# Altium PCB PCB1.PcbDoc
Units mm, origin at the board's own origin, x right, y up, seen from the top; angles counter-clockwise.
Board outline 40 x 25 mm, 4 copper layers (Top Layer, Ground Layer, Power Layer, Bottom Layer), stack 1.603 mm thick; 44 components, 25 nets, 168 pads, 65 vias.
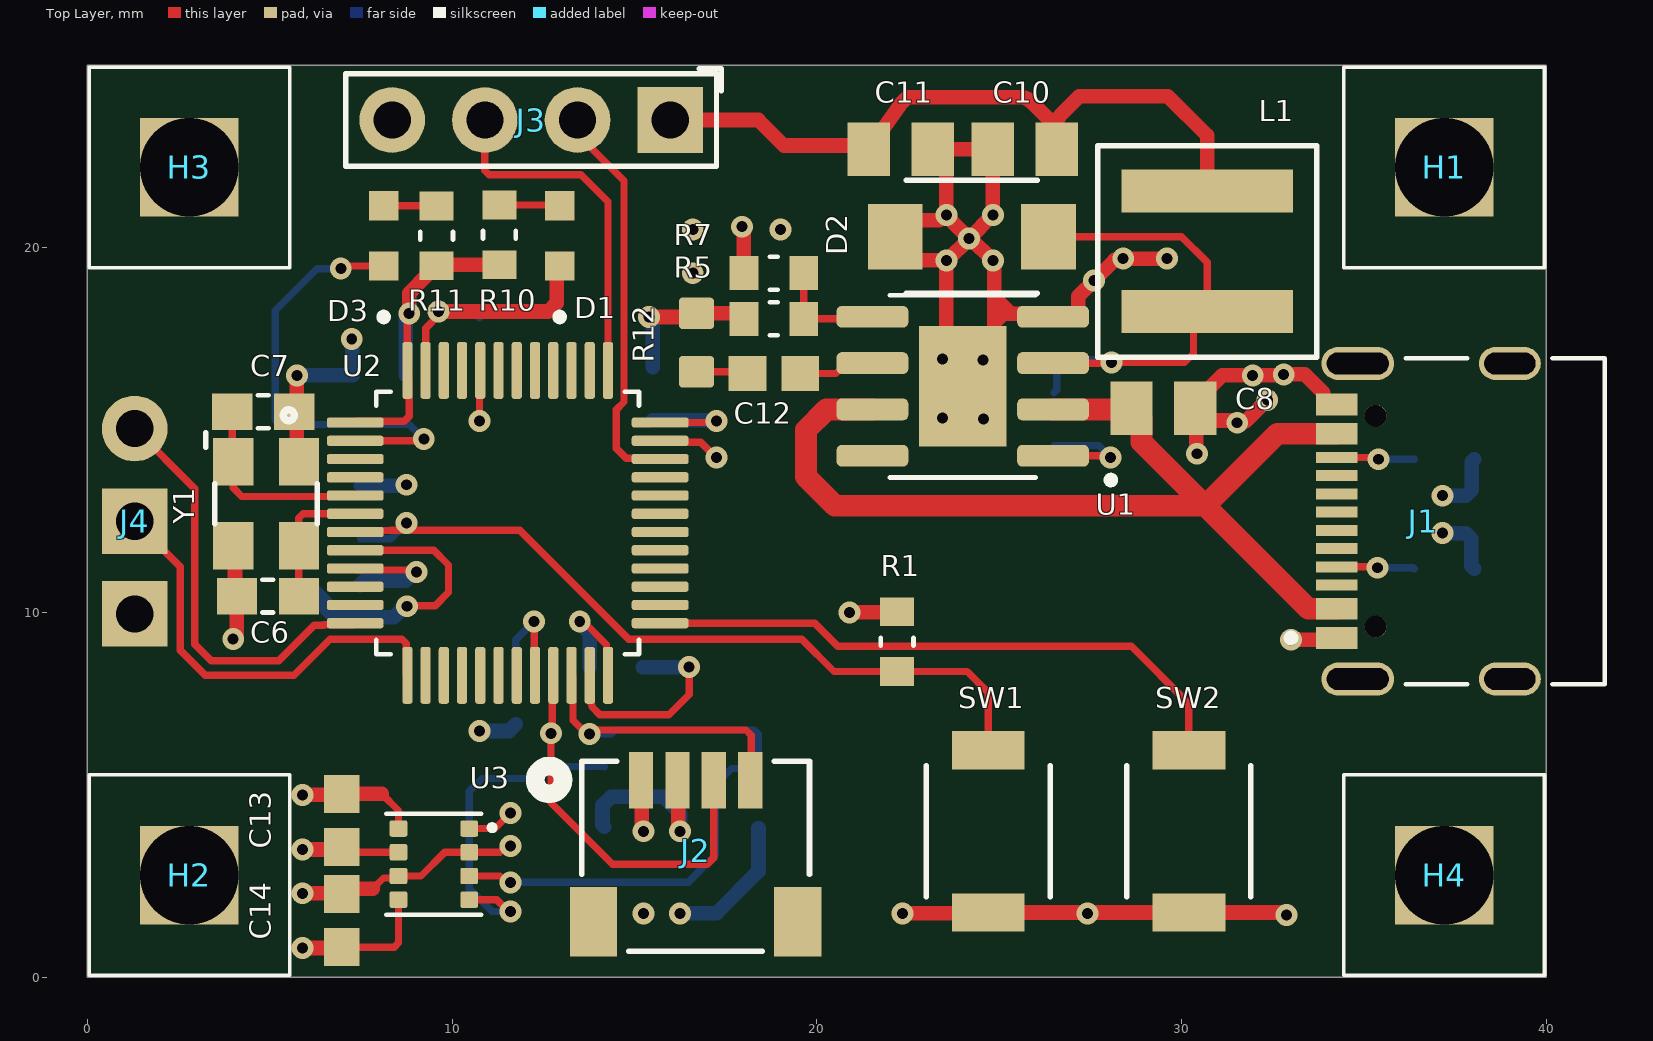
[diagram p0: Top Layer view]
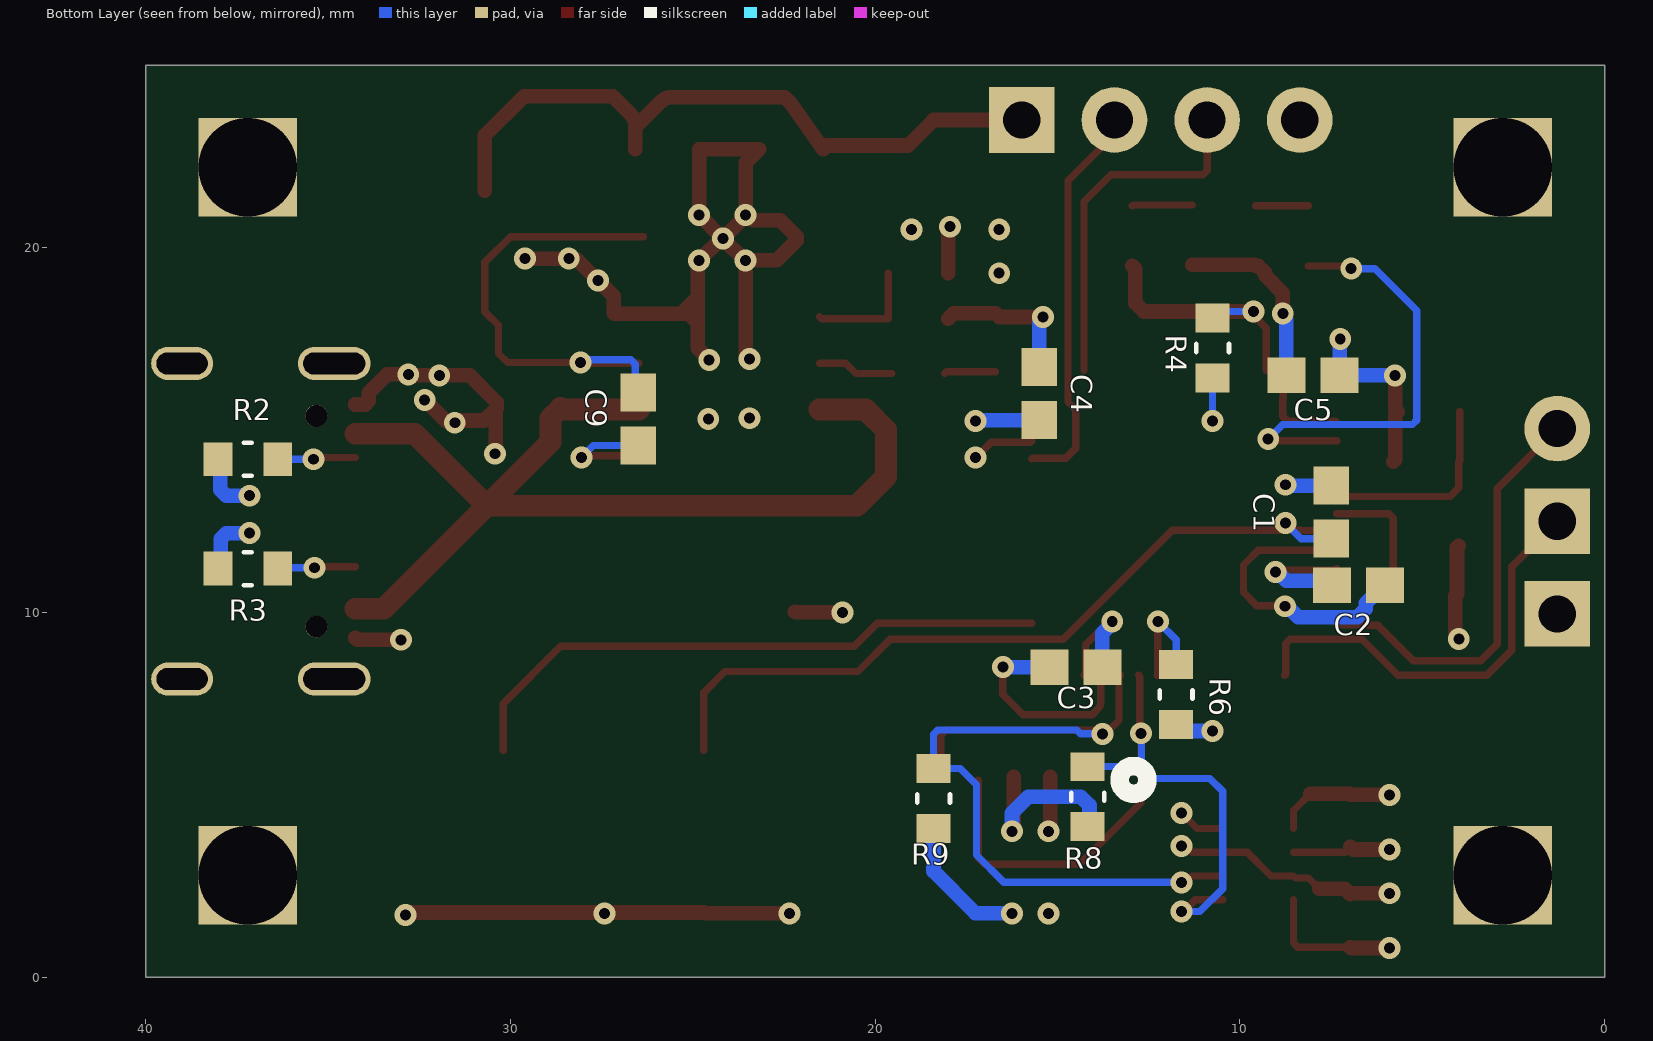
[diagram p1: Bottom Layer view, seen from below]
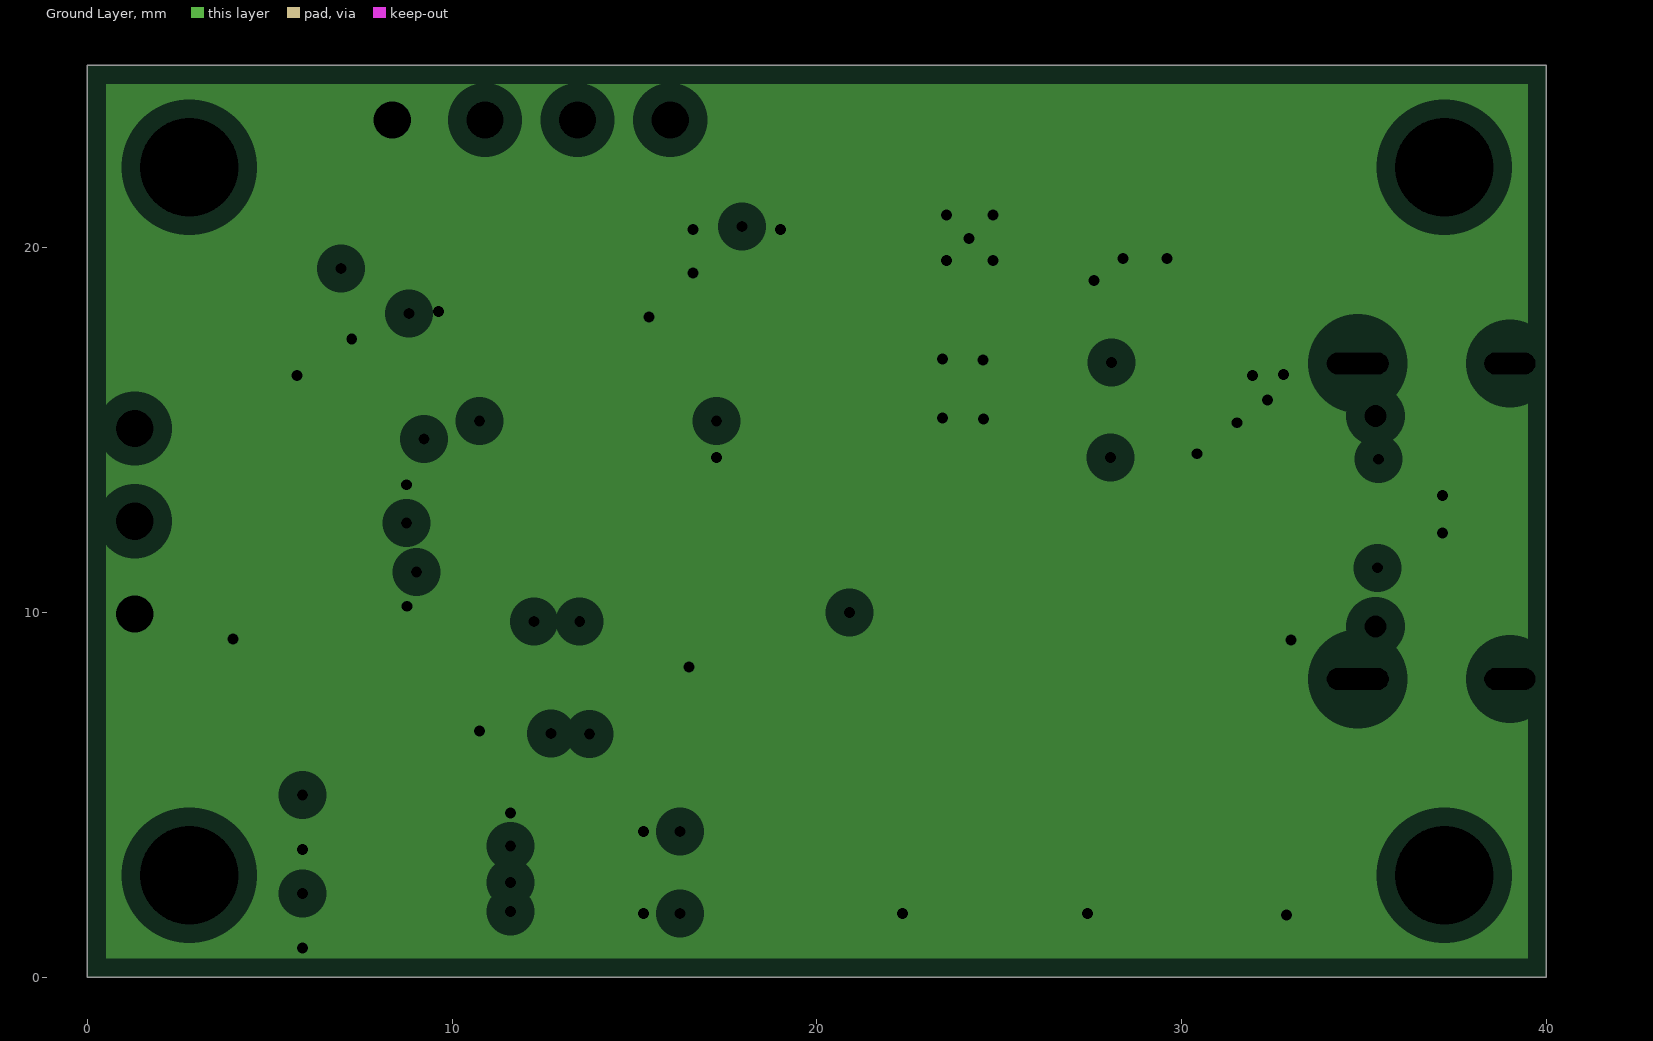
[diagram p2: Ground Layer, clearances drawn from the general rule]
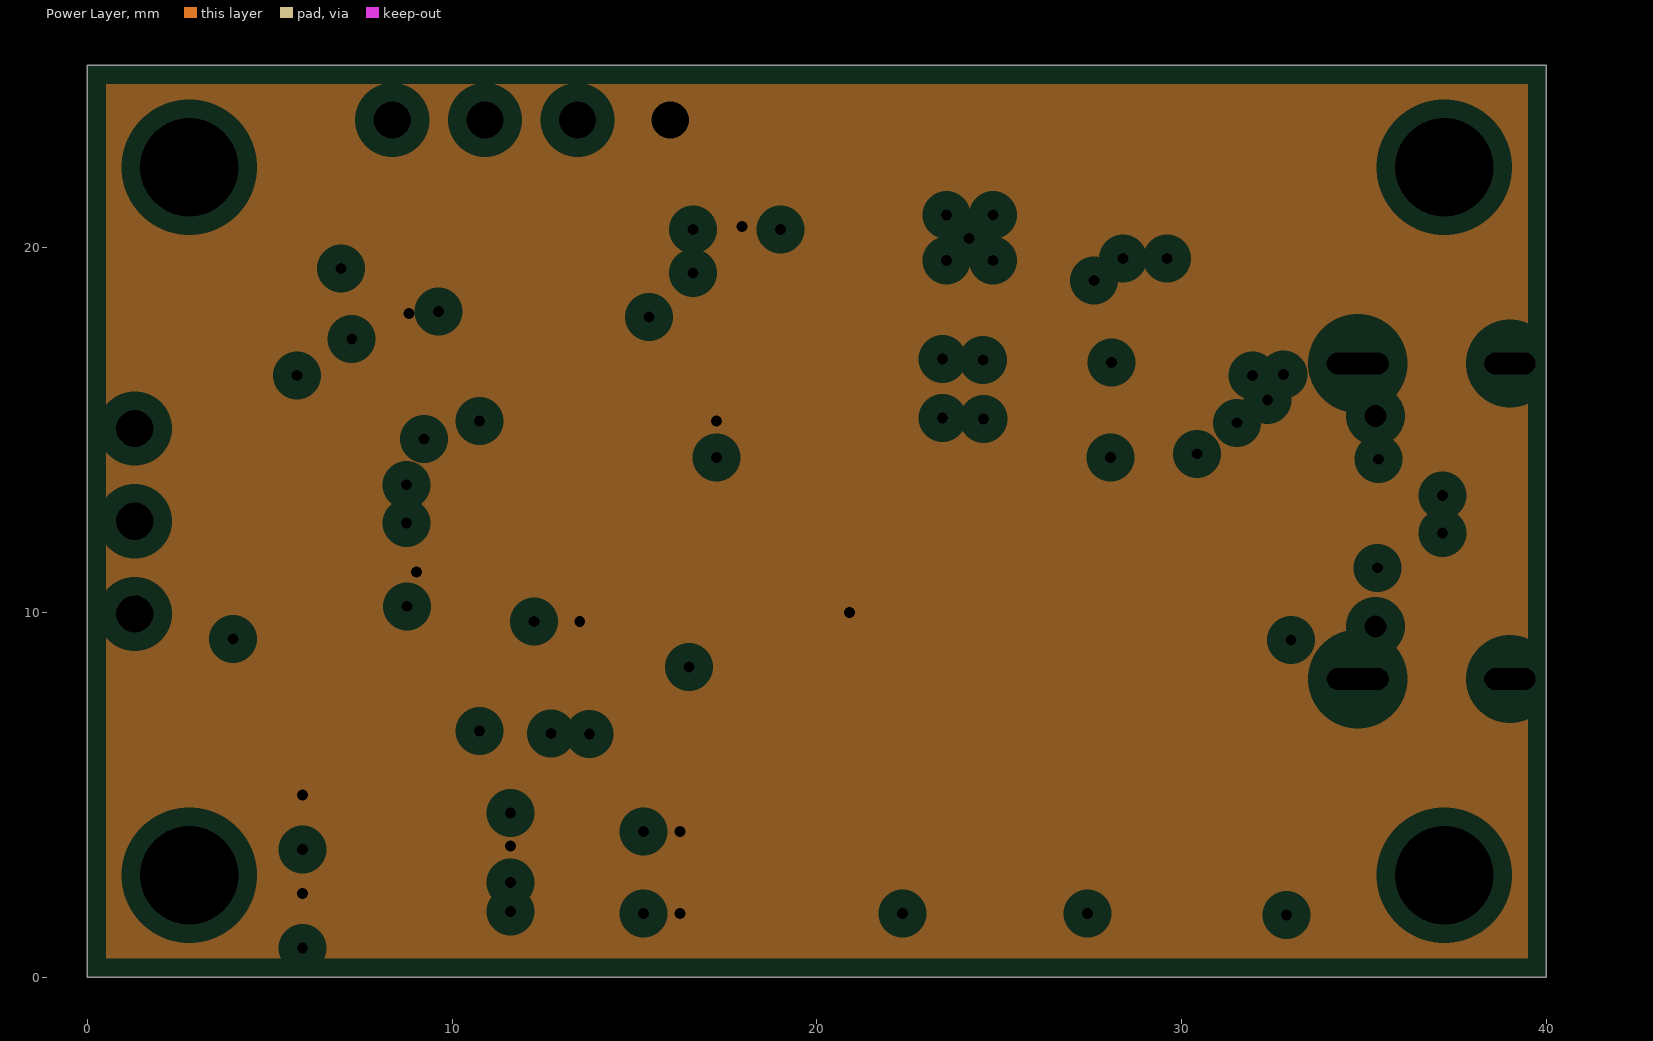
[diagram p3: Power Layer, clearances drawn from the general rule]
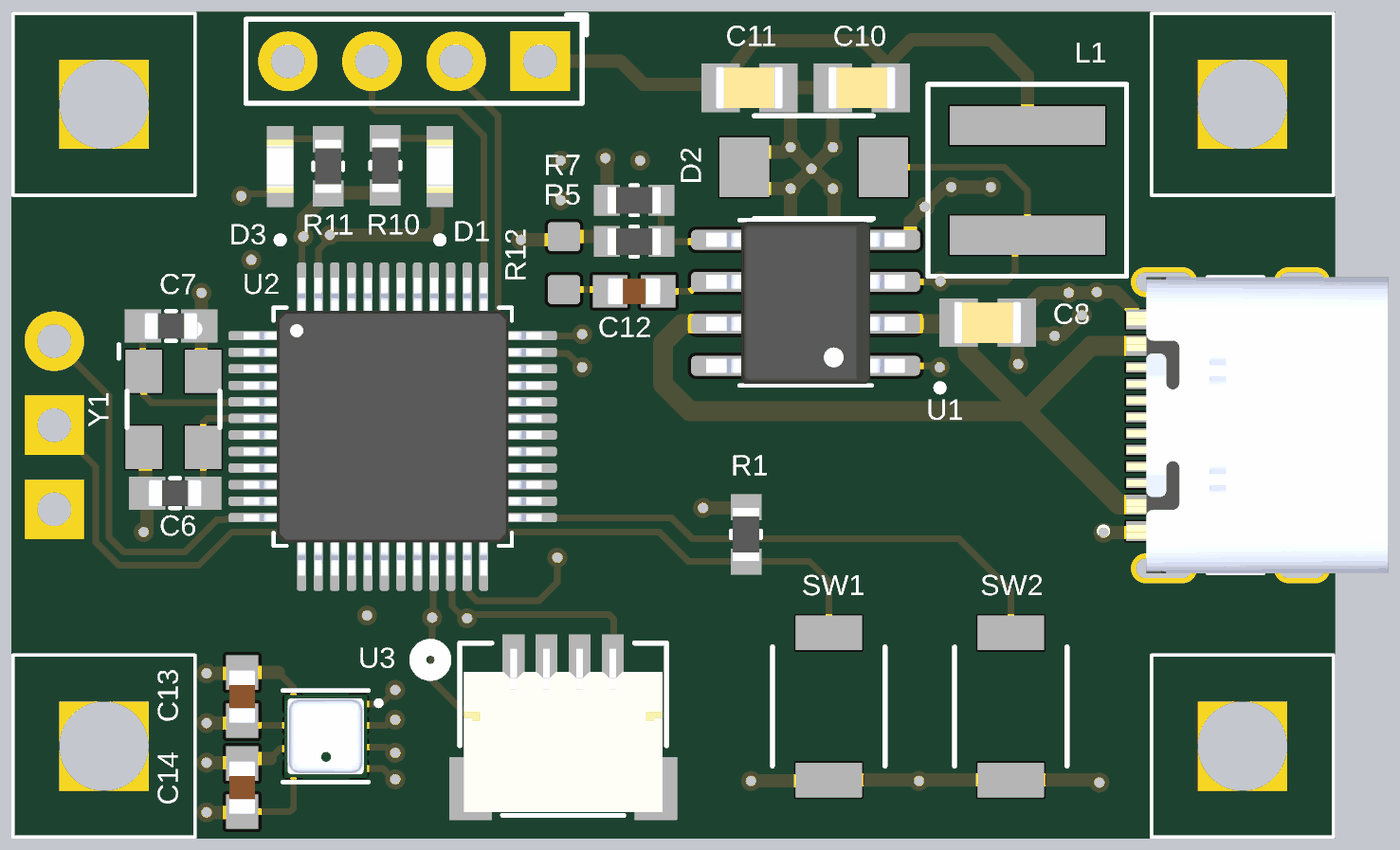
[diagram p4: 3D render of the assembled board from above, using the file's embedded part models]
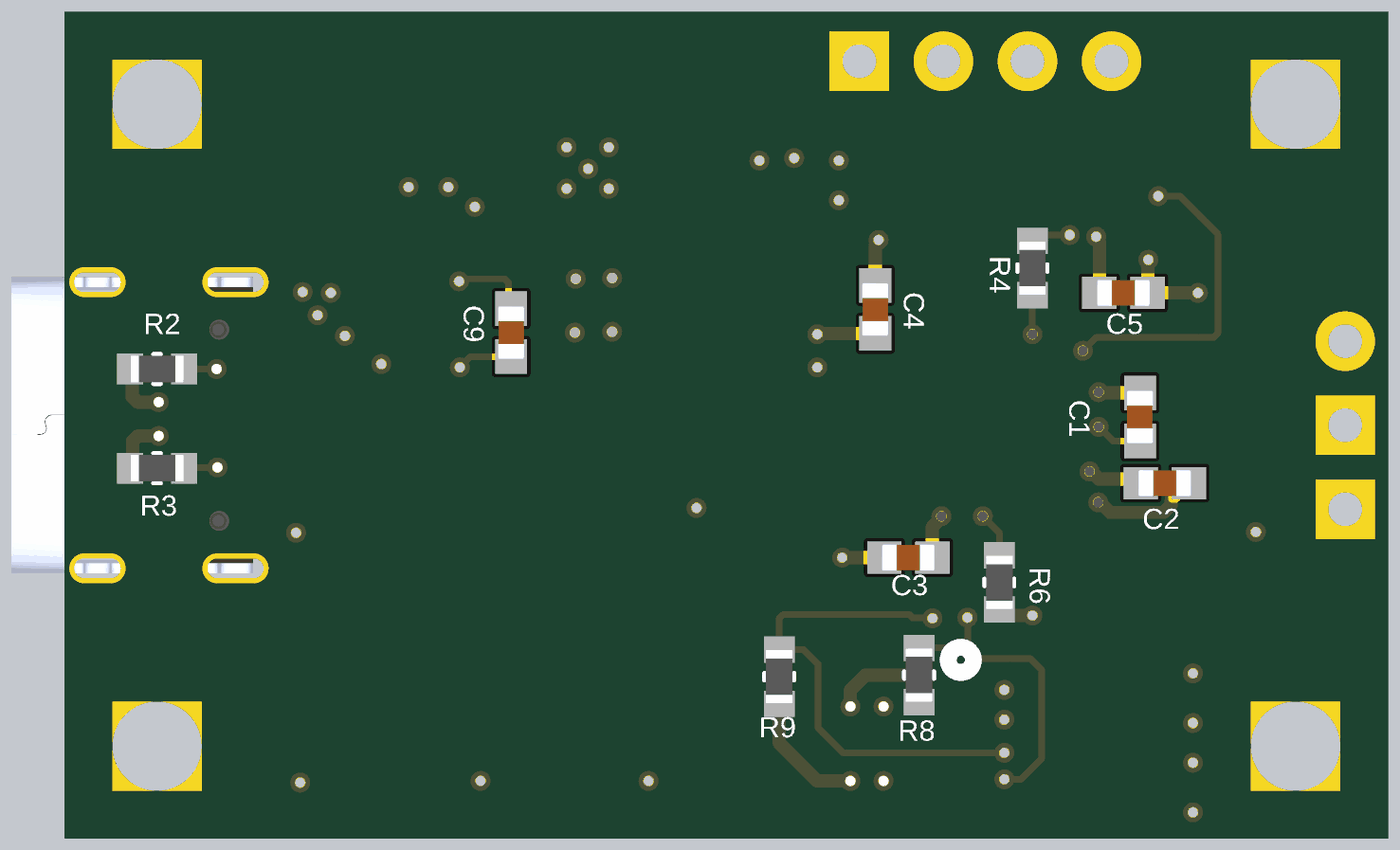
[diagram p5: 3D render of the assembled board from below, using the file's embedded part models]

## Layer stack, top to bottom
Top Solder: solder mask 0.0102, Solder Resist, Dk 3.5
Top Layer: signal copper 0.0356
Dielectric 2: prepreg 0.0711, PP-006, Dk 4.1
Ground Layer: plane copper 0.035, net GND
Dielectric 1: dielectric 1.32, FR-4, Dk 4.8
Power Layer: plane copper 0.035, net +3.3V
Dielectric 3: prepreg 0.0711, PP-006, Dk 4.1
Bottom Layer: signal copper 0.0356
Bottom Solder: solder mask 0.0102, Solder Resist, Dk 3.5

## Board outline
0,0 0,25 40,25 40,0

## Design rules (kind name [scope] priority, off if disabled: settings)
Clearance [All] p1: gap=0.2 ignorepadtopadclearanceinfootprint=FALSE
PlaneClearance [All] p1: clearance=0.508
PlaneConnect [All] p1: planeconnectstyle=Relief reliefexpansion=0.508 reliefentries=4 reliefconductorwidth=0.254 reliefairgap=0.254
PolygonConnect [iSVia] p1: connectstyle=Direct reliefconductorwidth=0.254 reliefentries=4 polygonreliefangle="90 Angle" airgapwidth=0.254
RoutingVias [All] p1: holewidth=0.4 width=0.8 viastyle="Through Hole" minholewidth=0.2 minwidth=0.4 maxholewidth=0.6 maxwidth=1.2
SolderMaskExpansion [All] p1: expansion=0 istentingtop=FALSE
SupplyNets "Schematic Supply Nets_2" [InNet('+5')] p1: voltage=0.000
SupplyNets "Schematic Supply Nets_1" [InNet('+3.3V')] p2: voltage=0.000
SupplyNets "Schematic Supply Nets" [InNet('GND')] p3: voltage=0.000
Width VIN_Power [InNetClass('VIN_Power')] p1: maxlimit=0.6 minlimit=0.6 preferedwidth=0.6
Width Power_GND [InNetClass('Power_Nets')] p2: maxlimit=0.4 minlimit=0.2 preferedwidth=0.4
Width Signal [All] p3: maxlimit=0.2 minlimit=0.2 preferedwidth=0.2
28 further rules are at their usual default settings.

## Classes and differential pairs
net class VIN_Power: +5
net class Power_Nets: +3.3V GND

## Components (designator, comment, footprint, x,y, rotation, side; value= is the part's Value field where it differs from the comment)
C1 "10nF" CAPC1608X95N 7.5,12.75 r270 bottom
C2 "100nF" CAPC1608X95N 6.75,10.75 r180 bottom
C3 "100nF" CAPC1608X95N 14.5,8.5 r0 bottom
C4 "100nF" CAPC1608X95N 15.5,16 r90 bottom
C5 "100nF" CAPC1608X95N 8,16.5 r180 bottom
C6 "22pF" CAPC1608X90 4.95,10.45 r180 top
C7 "22pF" CAPC1608X90 4.825,15.5 r180 top
C8 "10uF" CAPC2012X88N 29.5,15.6 r0 top
C9 "10nF" CAPC1608X95N 26.5,15.3 r270 bottom
C10 "22uF" CAPC2012X88N 25.7,22.7 r0 top
C11 "22uF" CAPC2012X88N 22.3,22.7 r180 top
C12 "3.9nF" CAPC1608X95N 18.82,16.55 r0 top
C13 "100nF" CAPC1608X95N 6.975,4.3 r270 top
C14 "100nF" CAPC1608X95N 6.975,1.55 r270 top
D1 "APT1608SGC" LED_APT1608SGC 12.95,20.325 r90 top
D2 "B340A-13-F" D_SMA_DO214AC 24.25,20.3 r180 top
D3 "D_LED_Red_0603" LED_APT1608SGC 8.125,20.325 r90 top value=APT1608SURCK
H1 "M2.5 NPTH" MH_M2_5_D2_7_NPTH 37.2,22.2 r0 top locked
H2 "M2.5 NPTH" MH_M2_5_D2_7_NPTH 2.8,2.8 r0 top locked
H3 "M2.5 NPTH" MH_M2_5_D2_7_NPTH 2.8,22.2 r0 top locked
H4 "M2.5 NPTH" MH_M2_5_D2_7_NPTH 37.2,2.8 r0 top locked
J1 "J_USB-C_TYPE-C-31-M-12" HRO_TYPE-C-31-M-12 39,12.5 r90 top locked value=TYPE-C-31-M-12
J2 "J_SM04B-SRSS-TB" CONN_SM04B-SRSS-TB_JST 16.675,3.3 r180 top value=SM04B-SRSS-TB
J3 "J_Header_1x04_2.54mm_THT" HDR_1x04_P2.54_THT 15.98,23.5 r180 top value=TSW-104-07-G-S
J4 "J_Header_1x03_2.54mm_THT" HDR_1x03_P2.54_THT 1.3,15.04 r270 top value=TSW-103-07-G-S
L1 "10uH" L_XGL5050 30.7,19.9 r90 top
R1 "10K" RESC1608X55N_10K 22.2,9.2 r270 top
R2 "5.1K" RESC1608X55N_10K 37.2,14.2 r0 bottom
R3 "5.1K" RESC1608X55N_10K 37.2,11.2 r0 bottom
R4 "10K" RESC1608X55N_10K 10.75,17.25 r90 bottom
R5 "33K" RESC1608X55N_10K 18.82,18.05 r180 top
R6 "10K" RESC1608X55N_10K 11.75,7.75 r270 bottom
R7 "82K" RESC1608X55N_10K 18.82,19.3 r0 top
R8 "4.7K" RESC1608X55N_10K 14.175,4.95 r90 bottom
R9 "4.7K" RESC1608X55N_10K 18.4,4.9 r90 bottom
R10 "1K" RESC1608X55N_10K 11.3,20.35 r90 top
R11 "1K" RESC1608X55N_10K 9.575,20.325 r270 top
R12 "6.8K" RESC1608X55N 16.7,17.4 r270 top
SW1 "HX 3x4x2-2P-2.5N" SW_HX_3x4x2_2P 24.7,4 r90 top
SW2 "SW_SPST_3x4x2mm" SW_HX_3x4x2_2P 30.2,4 r270 top value="HX 3x4x2-2P-2.5N"
U1 "U_MP2307DN-LF-Z" SOIC127P600X170-9N 24,16.2 r180 top value=340kHz
U2 "U_STM32F103C8T6" QFP50P900X900X160-48N 11.525,12.455 r0 top locked value=72MHz
U3 "U_BME280" PSON65P250X250X100-8N 9.5,3.1 r0 top value=BME280
Y1 "8MHz" XTAL_ECX32_3225_4P 4.9,12.98 r270 top

## Footprints (in the part's own frame and the unit in brackets; to place one, negate y for a bottom-side part, rotate by r counter-clockwise, add the part's x,y. Pads: shape width x height; smd on the part's side, far side on the other; paste and mask are expansions set on the pad)
CAPC1608X90 [mm]
  rect 1.1x1 smd: 1(-0.85,0) 2(0.85,0)
  silkscreen extent -0.15,-0.45 0.15,0.45, body extent -0.8,-0.4 0.8,0.4, height 0.9
CAPC1608X95N [mm]
  rect 1.04x0.97 smd paste+0 mask+0.102: 1(-0.726,0) 2(0.726,0)
  body extent -0.8,-0.4 0.8,0.4, height 0.95
CAPC2012X88N [mm]
  rect 1.16x1.47 smd: 1(-0.875,0) 2(0.875,0)
  body extent -1.02,-0.64 1.02,0.64, height 1.4
CONN_SM04B-SRSS-TB_JST [mil]
  rect 26x61 smd: 1(59.06,-82.62) 2(19.69,-82.62) 3(-19.68,-82.62) 4(-59.06,-82.62)
  rect 51x75 smd: 5(-110.24,69.94) 6(110.24,69.94)
  silkscreen extent -123,-103 173,102, body extent -118,-97 118,98, height 117
D_SMA_DO214AC [mm] "SMA DO-214AC generic; pad 1 cathode; verify manufacturer land pattern"
  rect 1.5x1.8 smd paste+0 mask+0.05: 1(-2.1,0) 2(2.1,0)
  silkscreen extent -1.8,-1.55 1.8,1.55, body extent -2.65,-1.3 2.65,1.3, height 2.3
HDR_1x03_P2.54_THT [mm] "1x3 P2.54mm; 1.02mm plated holes; 1.8mm pads"
  round 1.8 hole 1.02: 1(0,0)
  rect 1.8x1.8 hole 1.02: 2(2.54,0) 3(5.08,0)
  body extent -1.27,-1.27 6.35,1.27, height 8.38
HDR_1x04_P2.54_THT [mm] "Samtec TSW 1x4 vertical header, 2.54mm pitch; 1.02mm plated holes, 1.8mm lands; square pad 1"
  rect 1.8x1.8 hole 1.02: 1(0,0)
  round 1.8 hole 1.02: 2(2.54,0) 3(5.08,0) 4(7.62,0)
  silkscreen extent -1.4,-1.4 8.89,1.27, body extent -1.27,-1.27 8.89,1.27, height 2.54
HRO_TYPE-C-31-M-12 [mm]
  rect 0.6x1.14 smd mask+0.05: A1_B12(-3.2,4.75) A4_B9(-2.4,4.75) B1_A12(3.2,4.75) B4_A9(2.4,4.75)
  rect 0.3x1.14 smd mask+0.05: A5(-1.25,4.75) A6(-0.25,4.75) A7(0.25,4.75) A8(1.25,4.75) B5(1.75,4.75) B6(0.75,4.75) B7(-0.75,4.75) B8(-1.75,4.75)
  oval 0.9x2 hole 0.6 slot 1.7 at 90 deg: S1(-4.325,4.17) S2(4.325,4.17)
  oval 0.9x1.7 hole 0.6 slot 1.4 at 90 deg: S3(-4.325,0) S4(4.325,0)
  round 0.6 hole 0.6 unplated: ""(-2.89,3.68) ""(2.89,3.68)
  silkscreen extent -4.47,-2.6 4.47,6.1, body extent -4.47,-2.6 4.47,5.31, height 3.31
L_XGL5050 [mm] "Coilcraft XGL5050 recommended land pattern; 3.31mm pad centers, 1.18x4.7mm pads"
  rect 1.18x4.7 smd paste+0 mask+0.05: 1(-1.655,0) 2(1.655,0)
  silkscreen extent -2.9,-3 2.9,3, body extent -2.64,-2.74 2.64,2.74, height 5.1
LED_APT1608SGC [mm]
  rect 0.8x0.8 smd: 1(-0.825,0) 2(0.825,0)
  silkscreen extent -2.32,-0.1 -2.13,0.1, body extent -0.8,-0.4 0.8,0.4, height 0.75
MH_M2_5_D2_7_NPTH [mm] "M2.5 mounting hole; drill 2.7mm NPTH; no copper annulus; 5.5mm screw-head envelope on Mechanical 15"
  rect 2.7x2.7 hole 2.7 unplated: ""(0,0)
  silkscreen extent -2.75,-2.75 2.75,2.75
PSON65P250X250X100-8N [mm]
  rrect25% 0.49x0.45 smd paste+0 mask+0.102: 1(0.97,0.975) 2(0.97,0.325) 3(0.97,-0.325) 4(0.97,-0.975) 5(-0.97,-0.975) 6(-0.97,-0.325) 7(-0.97,0.325) 8(-0.97,0.975)
  silkscreen extent -1.3,-1.39 1.65,1.39, body extent -1.25,-1.25 1.25,1.25, height 1
QFP50P900X900X160-48N [mm]
  rrect50% 1.56x0.28 smd: 1(-4.18,2.75) 2(-4.18,2.25) 3(-4.18,1.75) 4(-4.18,1.25) 5(-4.18,0.75) 6(-4.18,0.25) 7(-4.18,-0.25) 8(-4.18,-0.75) 9(-4.18,-1.25) 10(-4.18,-1.75) 11(-4.18,-2.25) 12(-4.18,-2.75) 25(4.18,-2.75) 26(4.18,-2.25) 27(4.18,-1.75) 28(4.18,-1.25) 29(4.18,-0.75) 30(4.18,-0.25) 31(4.18,0.25) 32(4.18,0.75) 33(4.18,1.25) 34(4.18,1.75) 35(4.18,2.25) 36(4.18,2.75)
  rrect50% 0.28x1.56 smd: 13(-2.75,-4.18) 14(-2.25,-4.18) 15(-1.75,-4.18) 16(-1.25,-4.18) 17(-0.75,-4.18) 18(-0.25,-4.18) 19(0.25,-4.18) 20(0.75,-4.18) 21(1.25,-4.18) 22(1.75,-4.18) 23(2.25,-4.18) 24(2.75,-4.18) 37(2.75,4.18) 38(2.25,4.18) 39(1.75,4.18) 40(1.25,4.18) 41(0.75,4.18) 42(0.25,4.18) 43(-0.25,4.18) 44(-0.75,4.18) 45(-1.25,4.18) 46(-1.75,4.18) 47(-2.25,4.18) 48(-2.75,4.18)
  silkscreen extent -6.15,-3.6 3.6,3.6, body extent -4.5,-4.5 4.5,4.5, height 1.6
RESC1608X55N [mm]
  rrect25% 0.87x0.97 smd paste+0 mask+0.102: 1(-0.8,0) 2(0.8,0)
  body extent -0.8,-0.4 0.8,0.4, height 0.55
RESC1608X55N_10K [mm]
  rect 0.79x0.93 smd: 1(-0.82,0) 2(0.82,0)
  silkscreen extent -0.11,-0.45 0.11,0.45, body extent -0.8,-0.4 0.8,0.4, height 0.55
SOIC127P600X170-9N [mm]
  rrect50% 1.97x0.6 smd paste+0 mask+0.102: 1(-2.475,1.905) 2(-2.475,0.635) 3(-2.475,-0.635) 4(-2.475,-1.905) 5(2.475,-1.905) 6(2.475,-0.635) 7(2.475,0.635) 8(2.475,1.905)
  rect 2.41x3.3 smd paste-3 mask+0.102: 9(0,0)
  silkscreen extent -4.16,-2.5 2,2.67, body extent -3,-2.45 3,2.45, height 1.7
SW_HX_3x4x2_2P [mm] "Hanxia HX 3x4x2-2P; pad outer span5.5 inner gap3.4 height2mm"
  rect 1.05x2 smd paste+0 mask+0.05: 1(-2.225,0) 2(2.225,0)
  silkscreen extent -1.8,-1.7 1.8,1.7, body extent -2.45,-1.5 2.45,1.5, height 2
XTAL_ECX32_3225_4P [mm] "ECS ECX-32, 3.2x2.5x0.8mm; 4 pads; 1/3 crystal, 2/4 GND; manufacturer suggested land"
  rect 1.3x1.1 smd paste+0 mask+0.05: 1(-1.15,-0.9) 2(1.15,-0.9) 3(1.15,0.9) 4(-1.15,0.9)
  silkscreen extent -1.95,-1.65 0.55,1.4, body extent -1.5,-1.15 1.5,1.15, height 0.8

## Part data
C1 C9: library part C_10nF_5%_50V_0603, "10nF +/-5% 50V X7R ceramic capacitor 0603", Dielectric=X7R, Package=0603, Tolerance=5%, Voltage=50V, BOM References=C3, Capacitance=10nF, Datasheet=https://search.kemet.com/component-documentation/download/specsheet/C0603X103J5RECAUTO, MF=KEMET, MP=C0603X103J5RECAUTO
C2 C3 C4 C5 C13 C14: library part C_100nF_10%_16V_0603, "100nF +/-10% 16V X7R ceramic capacitor 0603", Dielectric=X7R, Package=0603, Tolerance=10%, Voltage=16V, BOM References=C4-C8, Capacitance=100nF, Datasheet=https://search.kemet.com/component-documentation/download/specsheet/C0603C104K4RACTU, MF=KEMET, MP=C0603C104K4RACTU
C6 C7: library part C_22pF_2%_50V_0603, "22pF +/-2% 50V C0G ceramic capacitor 0603", Dielectric=C0G, Package=0603, Tolerance=2%, Voltage=50V, BOM References=C9,C10, Capacitance=22pF, Datasheet=https://www.yageogroup.com/component-documentation/download/specsheet/CC0603GRNPO9BN220, MF=Yageo, MP=CC0603GRNPO9BN220
C8: library part C_10uF_10%_25V_0805, "10uF +/-10% 25V X5R ceramic capacitor 0805", Dielectric=X5R, Package=0805, Tolerance=10%, Voltage=25V, BOM References=C1,C2, Capacitance=10uF, Datasheet=https://search.kemet.com/component-documentation/download/specsheet/C0805C106K3PACTU, MF=KEMET, MP=C0805C106K3PACTU
C10 C11: library part C_22uF_20%_10V_0805, "22uF 20% 10V X5R ceramic capacitor 0805", Dielectric=X5R, Package=0805, Tolerance=20%, Voltage=10V, Capacitance=22uF, Datasheet=https://product.tdk.com/en/search/capacitor/ceramic/mlcc/info?part_no=C2012X5R1A226M125AB, MF=TDK, MP=C2012X5R1A226M125AB
C12: library part C_3n9_5%_50V_0603, "3.9nF 5% 50V C0G ceramic capacitor 0603", Dielectric=C0G, Package=0603, Tolerance=5%, Voltage=50V, Capacitance=3.9nF, Datasheet=https://product.tdk.com/en/search/capacitor/ceramic/mlcc/info?part_no=C1608C0G1H392J080AA, MF=TDK, MP=C1608C0G1H392J080AA
D1: library part D_LED_Green_0603, "Green LED, 0603 (1608 metric)", Color=Green, Package="0603 (1608 Metric)", BOM References=LED1, Datasheet=https://www.kingbrightusa.com/images/catalog/spec/APT1608SGC.pdf, MF=Kingbright, MP=APT1608SGC
D2: library part D_Schottky_40V_3A_SMA, "B340A-13-F Schottky rectifier, 40V 3A, SMA DO-214AC; cathode pin1, anode pin2", Current=3A, Package="SMA DO-214AC", Voltage=40V, BOM References=D1, Datasheet=https://www.diodes.com/part/view/B340A, MF="Diodes Incorporated", MP=B340A-13-F
D3: "Red LED, 0603 (1608 metric)", Color=Red, Package="0603 (1608 Metric)", BOM References=LED2,LED3, Datasheet=https://www.kingbrightusa.com/images/catalog/spec/apt1608surck.pdf, MF=Kingbright, MP=APT1608SURCK
H1 H2 H3 H4: library part H_MountingHole_M2_5_NPTH, "Mechanical mounting hole M2.5, 2.7mm NPTH", Hole diameter="2.7 mm", Screw head clearance="5.5 mm; Mechanical 15 outline"
J1: "TYPE-C-31-M-12 USB Type-C USB2.0 receptacle, 16 contacts", LCSC=C165948, Package="SMD top mount", BOM References=J1, Datasheet=https://datasheet.lcsc.com/lcsc/1903211732_Korean-Hroparts-Elec-TYPE-C-31-M-12_C165948.pdf, MF="Korean Hroparts Elec", MP=TYPE-C-31-M-12
J2: "JST SH 4-position 1.0mm right-angle side-entry SMT connector", Package="JST SH 1x4 1.0mm SMT", BOM References=J2, Datasheet=https://www.jst-mfg.com/product/pdf/eng/eSH.pdf, MF=JST, MP=SM04B-SRSS-TB, Pitch=1.0mm
J3: "Pin header 1x4, 2.54mm pitch, vertical through hole", Package="1x4 P2.54 THT", BOM References=J3, Datasheet=https://suddendocs.samtec.com/prints/tsw-xxx-xx-x-x-xx-xxx-footprint.pdf, MF=Samtec, MP=TSW-104-07-G-S, Number of Pins=4, Pitch=2.54mm
J4: "Pin header 1x3, 2.54mm pitch, vertical through hole", Package="1x3 P2.54 THT", BOM References=J4, Datasheet=https://suddendocs.samtec.com/prints/tsw-xxx-xx-x-x-xx-xxx-footprint.pdf, MF=Samtec, MP=TSW-103-07-G-S, Number of Pins=3, Pitch=2.54mm
L1: library part L_10uH_20%_2.5A_XGL5050, "10uH +/-20% shielded inductor, Isat 2.5A at 10% drop, DCR 33.6mOhm max, Coilcraft XGL5050", DC Resistance="33.6mOhm max", DC Resistance Requirement=<50mOhm, Package="5.28x5.48x5.10mm max height", Rated Current="4.6A at 20C rise", Saturation Current="2.5A at 10% drop; 3.7A at 20% drop", Saturation Current Requirement=>=2A, Tolerance=20%, BOM References=L1, Datasheet=https://www.coilcraft.com/getmedia/348b2df6-54b3-4579-8737-e8367b6fa367/xgl5050.pdf, Inductance=10uH, MF=Coilcraft, MP=XGL5050-103MEC
R1 R4 R6: library part R_10k_1%_1/10W_0603, "10k Ohms +/-1% 0.1W, 1/10W Chip Resistor 0603 (1608 Metric) Thick Film", Package="0603 (1608 Metric)", Power=0.1W, Resistance=10k, Tolerance=1%, BOM References=R10, Datasheet=https://www.yageo.com/upload/media/product/productsearch/datasheet/rchip/PYu-RC_Group_51_RoHS_L_12.pdf, MF=Yageo, MP=RC0603FR-0710KL, Technology="Thick Film"
R2 R3: library part R_5k1_1%_1/10W_0603, "5k1 Ohms +/-1% 0.1W, 1/10W Chip Resistor 0603 (1608 Metric) Thick Film", Package="0603 (1608 Metric)", Power=0.1W, Resistance=5k1, Tolerance=1%, BOM References=R1,R2, Datasheet=https://www.yageo.com/upload/media/product/productsearch/datasheet/rchip/PYu-RC_Group_51_RoHS_L_12.pdf, MF=Yageo, MP=RC0603FR-075K1L, Technology="Thick Film"
R5: library part R_33k_1%_1/10W_0603, "33k Ohms +/-1% 0.1W, 1/10W Chip Resistor 0603 (1608 Metric) Thick Film", Package="0603 (1608 Metric)", Power=0.1W, Resistance=33k, Tolerance=1%, BOM References=R6, Datasheet=https://www.yageo.com/upload/media/product/productsearch/datasheet/rchip/PYu-RC_Group_51_RoHS_L_12.pdf, MF=Yageo, MP=RC0603FR-0733KL, Technology="Thick Film"
R7: library part R_82k_1%_1/10W_0603, "82k Ohms +/-1% 0.1W, 1/10W Chip Resistor 0603 (1608 Metric) Thick Film", Package="0603 (1608 Metric)", Power=0.1W, Resistance=82k, Tolerance=1%, BOM References=R5, Datasheet=https://www.yageo.com/upload/media/product/productsearch/datasheet/rchip/PYu-RC_Group_51_RoHS_L_12.pdf, MF=Yageo, MP=RC0603FR-0782KL, Technology="Thick Film"
R8 R9: library part R_4k7_1%_1/10W_0603, "4k7 Ohms +/-1% 0.1W, 1/10W Chip Resistor 0603 (1608 Metric) Thick Film", Package="0603 (1608 Metric)", Power=0.1W, Resistance=4k7, Tolerance=1%, BOM References=R3,R4, Datasheet=https://www.yageo.com/upload/media/product/productsearch/datasheet/rchip/PYu-RC_Group_51_RoHS_L_12.pdf, MF=Yageo, MP=RC0603FR-074K7L, Technology="Thick Film"
R10 R11: library part R_1k_5%_1/10W_0603, "1k Ohms +/-5% 0.1W, 1/10W Chip Resistor 0603 (1608 Metric) Thick Film", Package="0603 (1608 Metric)", Power=0.1W, Resistance=1k, Tolerance=5%, BOM References=R7-R9, Datasheet=https://www.yageo.com/upload/media/product/productsearch/datasheet/rchip/PYu-RC_Group_51_RoHS_L_12.pdf, MF=Yageo, MP=RC0603JR-071KL, Technology="Thick Film"
R12: library part R_6k8_1%_1/10W_0603, "6.8kOhm 1% 0.1W thick film resistor 0603", Package="0603 (1608 Metric)", Power=0.1W, Resistance=6k8, Tolerance=1%, Datasheet=https://www.yageogroup.com/component-documentation/download/specsheet/RC0603FR-076K8L, MF=Yageo, MP=RC0603FR-076K8L, Technology="Thick Film"
SW1: library part SW_SPST_3x4x2mm, "Hanxia HX 3x4x2-2P-2.5N tactile switch, SPST-NO, 50mA 12V, 4x3x2mm", Current=50mA, LCSC=C36498961, Operating Force=2.5N, Package=3x4x2mm, Voltage=12V, BOM References=SW1,SW2, Configuration=SPST-NO, Datasheet=https://atta.szlcsc.com/upload/public/pdf/source/20250707/B47B221526B87D575FBEDE6D3B809220.pdf, MF=Hanxia, MP="HX 3x4x2-2P-2.5N"
SW2: "Hanxia HX 3x4x2-2P-2.5N tactile switch, SPST-NO, 50mA 12V, 4x3x2mm", Current=50mA, LCSC=C36498961, Operating Force=2.5N, Package=3x4x2mm, Voltage=12V, BOM References=SW1,SW2, Configuration=SPST-NO, Datasheet=https://atta.szlcsc.com/upload/public/pdf/source/20250707/B47B221526B87D575FBEDE6D3B809220.pdf, MF=Hanxia, MP="HX 3x4x2-2P-2.5N"
U1: "MP2307DN-LF-Z 3A, 23V, 340kHz step-down DC-DC regulator, SOIC-8-EP", Current=3A, Frequency=340kHz, Package=SOIC-8-EP, Voltage=23V, BOM References=U2, Datasheet=https://www.monolithicpower.com/en/mp2307.html, MF="Monolithic Power Systems", MP=MP2307DN-LF-Z
U2: "STM32F103C8T6 32-bit Cortex-M3 MCU, 64KB Flash, 72MHz, LQFP-48 7x7mm", Frequency=72MHz, Package="LQFP-48 (7x7mm)", BOM References=U1, Datasheet=https://www.st.com/resource/en/datasheet/stm32f103c8.pdf, Flash=64KB, MF=STMicroelectronics, MP=STM32F103C8T6
U3: "BME280 temperature, humidity and pressure sensor, LGA-8 2.5x2.5mm", Package="LGA-8 (2.5x2.5mm)", BOM References=U3, Datasheet=https://www.bosch-sensortec.com/media/boschsensortec/downloads/datasheets/bst-bme280-ds002.pdf, MF=Bosch, MP=BME280
Y1: library part Y_8MHz_20pF_3225, "ECS-80-20-33-JEN-TR3 8MHz quartz crystal, CL20pF, +/-20ppm, 3225 4-pad", Frequency Stability=+/-50ppm, Frequency Tolerance=+/-20ppm, Load Capacitance=20pF, Package="3225 4-pad", BOM References=X1, Datasheet=https://ecsxtal.com/store/pdf/ecx-32.pdf, Frequency=8MHz, MF="ECS Inc.", MP=ECS-80-20-33-JEN-TR3

## Via types
v1: diameter 0.6, hole 0.3, Top Layer to Bottom Layer, tented both sides, 65 vias

## Nets (pads, with @x,y where several pads share a name; then routed paths per layer and width w, separated by ;. In a path a pad name is that pad's centre, name@x,y a point inside that pad or via, vN(x,y) a via of type N, cw(c..) or ccw(c..) an arc to the next point about the centre after c; other vN are vias at no path point)
+3.3V: C2.1 C3.1 C4.1 C5.1 C10.2 C11.2 C13.1 C14.1 J2.2 J3.1 L1.2 R1.1 R7.1 R8.1 R9.1 R10.1 R11.2 U2.1 U2.9 U2.24 U2.36 U2.48 U3.2 U3.6 U3.8 | length 59.6
  Top Layer w0.2: U2.9 7.385,11.165 8.965,11.165 v1(9.025,11.105) ; U2.1 7.385,15.245 8.69,15.245 8.825,15.38 8.825,15.855 8.815,15.865 8.815,16.595 U2.48 8.775,18.15 v1(8.825,18.2) ; 7.826,2.423 8.123,2.721 8.476,2.721 U3.6 9.148,2.775 9.798,3.425 U3.2 11.317,3.425 11.492,3.6 v1(11.6,3.6) ; 8.074,5.026 8.53,4.57 U3.8 ; v1(13.5,9.75) 13.603,9.75 14.235,9.118 14.235,8.315 U2.24 ; U2.36 17.205,15.205 v1(17.25,15.25)
  Top Layer w0.4: v1(5.9,2.3) 6.951,2.3 C14.1 7.122,2.423 7.826,2.423 ; v1(5.9,5) 6.949,5 C13.1 8.074,5.026 ; v1(8.825,18.2) 8.825,18.755 9.31,19.24 9.31,19.31 9.505,19.505 R11.2 9.6,19.53 R10.1 ; J3.1 18.4,23.5 19.1,22.8 21.325,22.8 C11.2 21.805,23.235 22.337,23.984 22.478,24.125 25.584,24.125 cw(c25.584,23.725) 25.824,24.045 cw(c25.584,23.725) 25.867,24.008 26.545,23.33 26.575,23.3 C10.2 ; J2.2@16.2,5.499 16.2,4.104 v1@16.25,4.054 ; v1(17.95,20.575) 17.95,20.521 18,20.471 R7.1 ; v1(20.9,10) 22.18,10 R1.1 ; C10.2@26.575,23.359 cw(c26.975,23.359) 26.692,23.642 27.2,24.15 29.625,24.15 30.7,23.075 L1.2
  Bottom Layer w0.4: C2.1 7.595,10.869 8.735,10.869 8.971,11.105 v1(9.025,11.105) ; C5.1 8.726,18.047 8.825,18.146 v1(8.825,18.2) ; v1(13.5,9.75) 13.5,9.697 13.774,9.423 C3.1 ; R8.1 14.125,4.18 14.125,4.716 14.359,4.95 15.8,4.95 16.25,4.5 v1(16.25,4) ; C4.1 17.226,15.274 v1(17.25,15.25) ; v1(16.25,1.75) 17.25,1.75 18.4,2.9 R9.1
+5: C8.1 J1.A4_B9 J1.B4_A9 U1.2 U1.7 | length 29.5
  Top Layer w0.6: U1.7 20.265,15.565 19.699,14.999 19.699,13.726 20.5,12.925 30.648,12.925 ; U1.2 28.59,15.565 C8.1 28.905,15.32 28.905,14.668 30.648,12.925 ; J1.A4_B9 33.473,10.1 30.648,12.925 ; J1.B4_A9 32.623,14.9 30.648,12.925
BOOT0: R4.1 U2.44 | length 2.6
  Top Layer w0.2: v1(10.75,15.25) 10.75,16.61 U2.44
  Bottom Layer w0.2: v1(10.75,15.25) R4.1
BOOT1: R6.1 U2.20 | length 2.9
  Top Layer w0.2: v1(12.25,9.75) 12.25,8.3 U2.20
  Bottom Layer w0.2: R6.1 11.75,9.25 v1(12.25,9.75)
CC1: J1.A5 R3.1 | length 2.2
  Top Layer w0.2: J1.A5 35.35,11.25 v1(35.375,11.225)
  Bottom Layer w0.2: v1(35.375,11.225) 36.355,11.225 R3.1
CC2: J1.B5 R2.1 | length 2.2
  Top Layer w0.2: J1.B5 35.35,14.25 v1(35.4,14.2)
  Bottom Layer w0.2: v1(35.4,14.2) R2.1
GND: C1.1 C2.2 C3.2 C4.2 C5.2 C6.2 C7.1 C8.2 C10.1 C11.1 C13.2 C14.2 D1.1 D2.2 J1.A1_B12 J1.B1_A12 J2.1 J3.4 J4.3 R2.2 R3.2 R4.2 R5.2 R6.2 R12.1 SW1.1 SW2.2 U1.4 U1.9 U2.8 U2.23 U2.35 U2.47 U3.1 U3.5 U3.7 Y1.2 Y1.4 | length 94.6
  Top Layer w0.2: C14.2 8.413,0.824 8.53,0.941 U3.5 ; C13.2 7.124,3.425 U3.7 ; U2.8 9.495,11.705 9.9,11.3 9.9,10.55 9.537,10.187 8.78,10.187 v1(8.762,10.169) ; U2.47 9.275,17.793 9.623,18.142 v1(9.623,18.25) ; U3.1 11.175,4.075 v1(11.6,4.5) ; U2.23 13.815,8.235 13.815,7.498 13.835,7.478 13.835,7.412 14.052,7.195 15.945,7.195 16.5,7.75 v1(16.5,8.5) ; U2.35 15.745,14.665 16.816,14.665 17.231,14.25 v1(17.25,14.25) ; R12.1@16.6,18.1 R12.1
  Top Layer w0.4: v1(4,9.275) 4,9.329 4.1,9.429 C6.2 4.05,10.5 4.05,11.78 Y1.2 ; v1(5.75,16.5) 5.743,16.493 5.743,15.568 C7.1 5.737,15.437 5.737,14.193 Y1.4 ; v1(5.9,0.8) 6.951,0.8 C14.2 ; v1(5.9,3.5) 6.901,3.5 C13.2 ; v1(9.623,18.25) 12.641,18.25 12.875,18.484 12.875,19.425 D1.1 ; J2.1@15.2,5.499 15.2,4.104 v1@15.25,4.054 ; v1(15.4,18.1) R12.1@16.6,18.1 ; R12.1 17.85,18.2 R5.2 ; v1(22.35,1.75) 24.675,1.75 SW1.1 27.4,1.775 v1(27.425,1.75) 27.45,1.775 SW2.2 32.746,1.775 32.821,1.7 v1(32.875,1.7) ; v1(23.45,16.95) 23.55,17.05 v1(23.55,19.65) ; v1(24.55,16.925) 24.863,17.238 24.863,17.938 ; v1(29.6,19.7) v1(28.4,19.7) 28.362,19.662 28.162,19.662 v1(27.6,19.1) 27.163,18.663 27.163,18.205 27.146,18.188 25.312,18.188 ; v1(30.425,14.35) 30.4,14.375 C8.2@30.4,15.575 ; v1(32.35,15.825) 31.763,15.238 31.563,15.238 v1(31.525,15.2) 31.471,15.2 31.408,15.263 30.712,15.263 C8.2@30.4,15.575 ; v1(33,9.25) 34.2,9.25 J1.A1_B12 ; J1.B1_A12 33.98,15.7 33.88,15.8 33.88,16.023 33.378,16.525 v1(32.8,16.525) 32.775,16.5 v1(31.95,16.5) 31.12,16.5 30.375,15.755 C8.2 C8.2@30.4,15.575 ; v1(23.55,19.65) 23.575,19.65 v1(24.175,20.25) ; v1(23.55,19.65) 22.7,19.65 22.15,20.2 D2.2 22.607,20.757 23.353,20.757 23.496,20.9 v1(23.55,20.9) ; v1(23.55,20.9) 23.55,20.875 v1(24.175,20.25) ; v1(23.55,20.9) 23.55,22.325 C11.1 C10.1 v1(24.825,20.9) v1(24.175,20.25) ; v1(24.175,20.25) 24.225,20.25 v1(24.825,19.65) 24.863,19.612 24.863,18.637 ; 24.863,17.938 24.863,18.637 ; 24.863,17.938 25.113,18.188 25.312,18.188 ; 24.863,18.637 25.312,18.188
  Bottom Layer w0.2: v1(9.623,18.25) 10.57,18.25 R4.2
  Bottom Layer w0.4: v1(5.75,16.5) C5.2 7.262,16.512 7.262,17.488 v1(7.25,17.5) ; C2.2 6.059,10.75 6.556,10.253 6.556,10.099 6.79,9.865 8.404,9.865 8.708,10.169 v1(8.762,10.169) ; C1.1 8.726,13.476 v1(8.75,13.5) ; v1(10.75,6.75) 11.57,6.75 R6.2 ; C3.2 v1(16.5,8.5) ; v1(15.4,18.1) 15.4,18.046 15.5,17.946 C4.2 ; v1(37.15,12.175) 37.786,12.175 37.936,12.025 37.936,11.284 R3.2 ; v1(37.15,13.2) 37.786,13.2 37.955,13.369 37.955,14.135 R2.2
  other v1: 15.25,1.75 15.25,4 24.575,15.3 23.45,15.325 16.6,19.3 16.6,20.5 19,20.5
I2C_SCL: J2.3 R8.2 U2.21 U3.4 | length 21.3
  Top Layer w0.2: U3.4 11.226,2.125 11.551,1.8 v1(11.6,1.8) v1@11.649,1.8 ; v1@12.715,6.611 v1(12.715,6.686) ; U2.21 12.745,8.245 12.745,6.716 v1(12.715,6.686) ; J2.3 17.175,3.275 17,3.1 14.4,3.1 12.715,4.785 12.715,6.535 12.639,6.611 v1(12.715,6.686)
  Bottom Layer w0.2: v1(11.6,1.8) 11.1,1.8 10.475,2.425 10.475,5.1 10.825,5.45 12.375,5.45 12.7,5.775 ; v1(12.715,6.686) 12.7,6.671 12.7,5.775 ; R8.2 14.17,5.775 12.7,5.775
I2C_SDA: J2.4 R9.2 U2.22 U3.3 | length 23.6
  Top Layer w0.2: U3.3 11.317,2.775 11.492,2.6 v1(11.6,2.6) ; U2.22 13.315,8.235 13.315,7.043 13.567,6.791 v1@13.77,6.791 ; v1(13.77,6.665) v1@13.77,6.791 ; J2.4@18.2,5.499 18.2,6.633 18.058,6.775 14,6.775 13.984,6.791 v1@13.77,6.791
  Bottom Layer w0.2: v1(11.6,2.6) 16.475,2.6 17.225,3.35 17.225,5.275 17.67,5.72 R9.2 18.4,6.658 18.283,6.775 14.47,6.775 14.37,6.675 13.78,6.675 v1(13.77,6.665)
LED_STATUS: D3.1 U2.2 | length 12.7
  Top Layer w0.2: v1(6.95,19.425) 7.025,19.5 D3.1 ; U2.2 9.18,14.705 v1(9.225,14.75)
  Bottom Layer w0.2: v1(6.95,19.425) 6.3,19.425 5.15,18.275 5.15,15.267 5.267,15.15 8.825,15.15 v1(9.225,14.75)
NetC9_1: C9.1 D2.1 L1.1 U1.3 | length 13.6
  Top Layer w0.2: D2.1 30,20.3 30.7,19.6 L1.1 30.325,17.87 30.325,17.1 30.075,16.85 v1(28.075,16.85) 28.06,16.835 U1.3
  Bottom Layer w0.2: C9.1 26.575,16.101 26.575,16.808 26.692,16.925 28,16.925 v1(28.075,16.85)
NetC9_2: C9.2 U1.1 | length 3.3
  Top Layer w0.2: U1.1 28.005,14.295 v1(28.05,14.25)
  Bottom Layer w0.2: C9.2 27.726,14.574 v1(28.05,14.25)
NetC12_1: C12.1 R12.2 | length 1.4
  Top Layer w0.2: R12.2 18.044,16.6 C12.1
NetC12_2: C12.2 U1.6 | length 2.1
  Top Layer w0.2: C12.2 20.528,16.55 20.813,16.835 U1.6
NetD1_2: D1.2 R10.2 | length 1.7
  Top Layer w0.2: R10.2 12.93,21.17 D1.2
NetD3_2: D3.2 R11.1 | length 1.5
  Top Layer w0.2: D3.2 9.57,21.15 R11.1
NetR5_1: R5.1 R7.2 U1.5 | length 3.2
  Top Layer w0.2: R7.2 R5.1 21.47,18.05 U1.5
NRST: C1.2 R1.2 SW1.2 U2.7 | length 22.4
  Top Layer w0.2: U2.7 7.385,12.245 8.331,12.245 8.336,12.25 v1@8.75,12.25 ; v1(8.75,12.45) v1@8.75,12.25 ; SW1.2 24.7,7.8 24.12,8.38 R1.2 20.47,8.38 19.585,9.265 14.842,9.265 11.857,12.25 v1@8.75,12.25
  Bottom Layer w0.2: C1.2 8.324,12.024 v1(8.75,12.45)
OSC_IN: C7.2 U2.5 Y1.1 | length 5.5
  Top Layer w0.2: C7.2 3.975,14.155 Y1.1 4,13.417 4.237,13.18 7.32,13.18 U2.5
OSC_OUT: C6.1 U2.6 Y1.3 | length 3.7
  Top Layer w0.2: C6.1 Y1.3 5.8,12.588 5.917,12.705 U2.6
RX: J4.2 U2.13 | length 11.9
  Top Layer w0.2: J4.2 2.55,11.25 2.55,8.959 3.234,8.275 5.665,8.275 6.655,9.265 8.627,9.265 8.745,9.148 8.745,8.305 U2.13
SWCLK: J3.3 U2.37 | length 9.7
  Top Layer w0.2: J3.3 10.9,22.117 11.017,22 13.533,22 14.275,21.258 U2.37
SWDIO: J3.2 U2.34 | length 10.9
  Top Layer w0.2: J3.2 13.44,23.11 14.715,21.835 14.715,15.772 14.5,15.557 14.5,14.5 14.775,14.225 15.685,14.225 U2.34
TX: J4.1 U2.12 | length 11.6
  Top Layer w0.2: J4.1 2.95,13.39 2.95,9.125 3.4,8.675 5.25,8.675 6.225,9.65 6.474,9.65 6.489,9.665 7.305,9.665 U2.12
USER_BTN: SW2.1 U2.25 | length 16.7
  Top Layer w0.2: U2.25 19.945,9.705 20.575,9.075 28.625,9.075 30.2,7.5 SW2.1
pads on no net: H1. H2. H3. H4. J1. J1.A6 J1.A7 J1.A8 J1.B6 J1.B7 J1.B8 J1.S1 J1.S2 J1.S3 J1.S4 J2.5 J2.6 U1.8 U2.3 U2.4 U2.10 U2.11 U2.14 U2.15 U2.16 U2.17 U2.18 U2.19 U2.26 U2.27 U2.28 U2.29 U2.30 U2.31 U2.32 U2.33 U2.38 U2.39 U2.40 U2.41 U2.42 U2.43 U2.45 U2.46

## Polygon pours and split planes (outlines as drawn)
GND on Ground Layer (split plane): 39.49,0.51 0.51,0.51 0.51,24.49 39.49,24.49
+3.3V on Power Layer (split plane): 39.49,0.51 0.51,0.51 0.51,24.49 39.49,24.49

## Silkscreen, mask and mechanical layers (free items; w line width, h text height)
Mechanical 1:
  the board outline again, w0.254